# Altium PCB PCB_Cyborg greenC_Main.PcbDoc
Units mm, origin at the board's own origin, x right, y up, seen from the top; angles counter-clockwise.
Board outline 36.5 x 45.5 mm, 2 copper layers (Top Layer, Bottom Layer); 59 components, 74 nets, 243 pads, 102 vias.
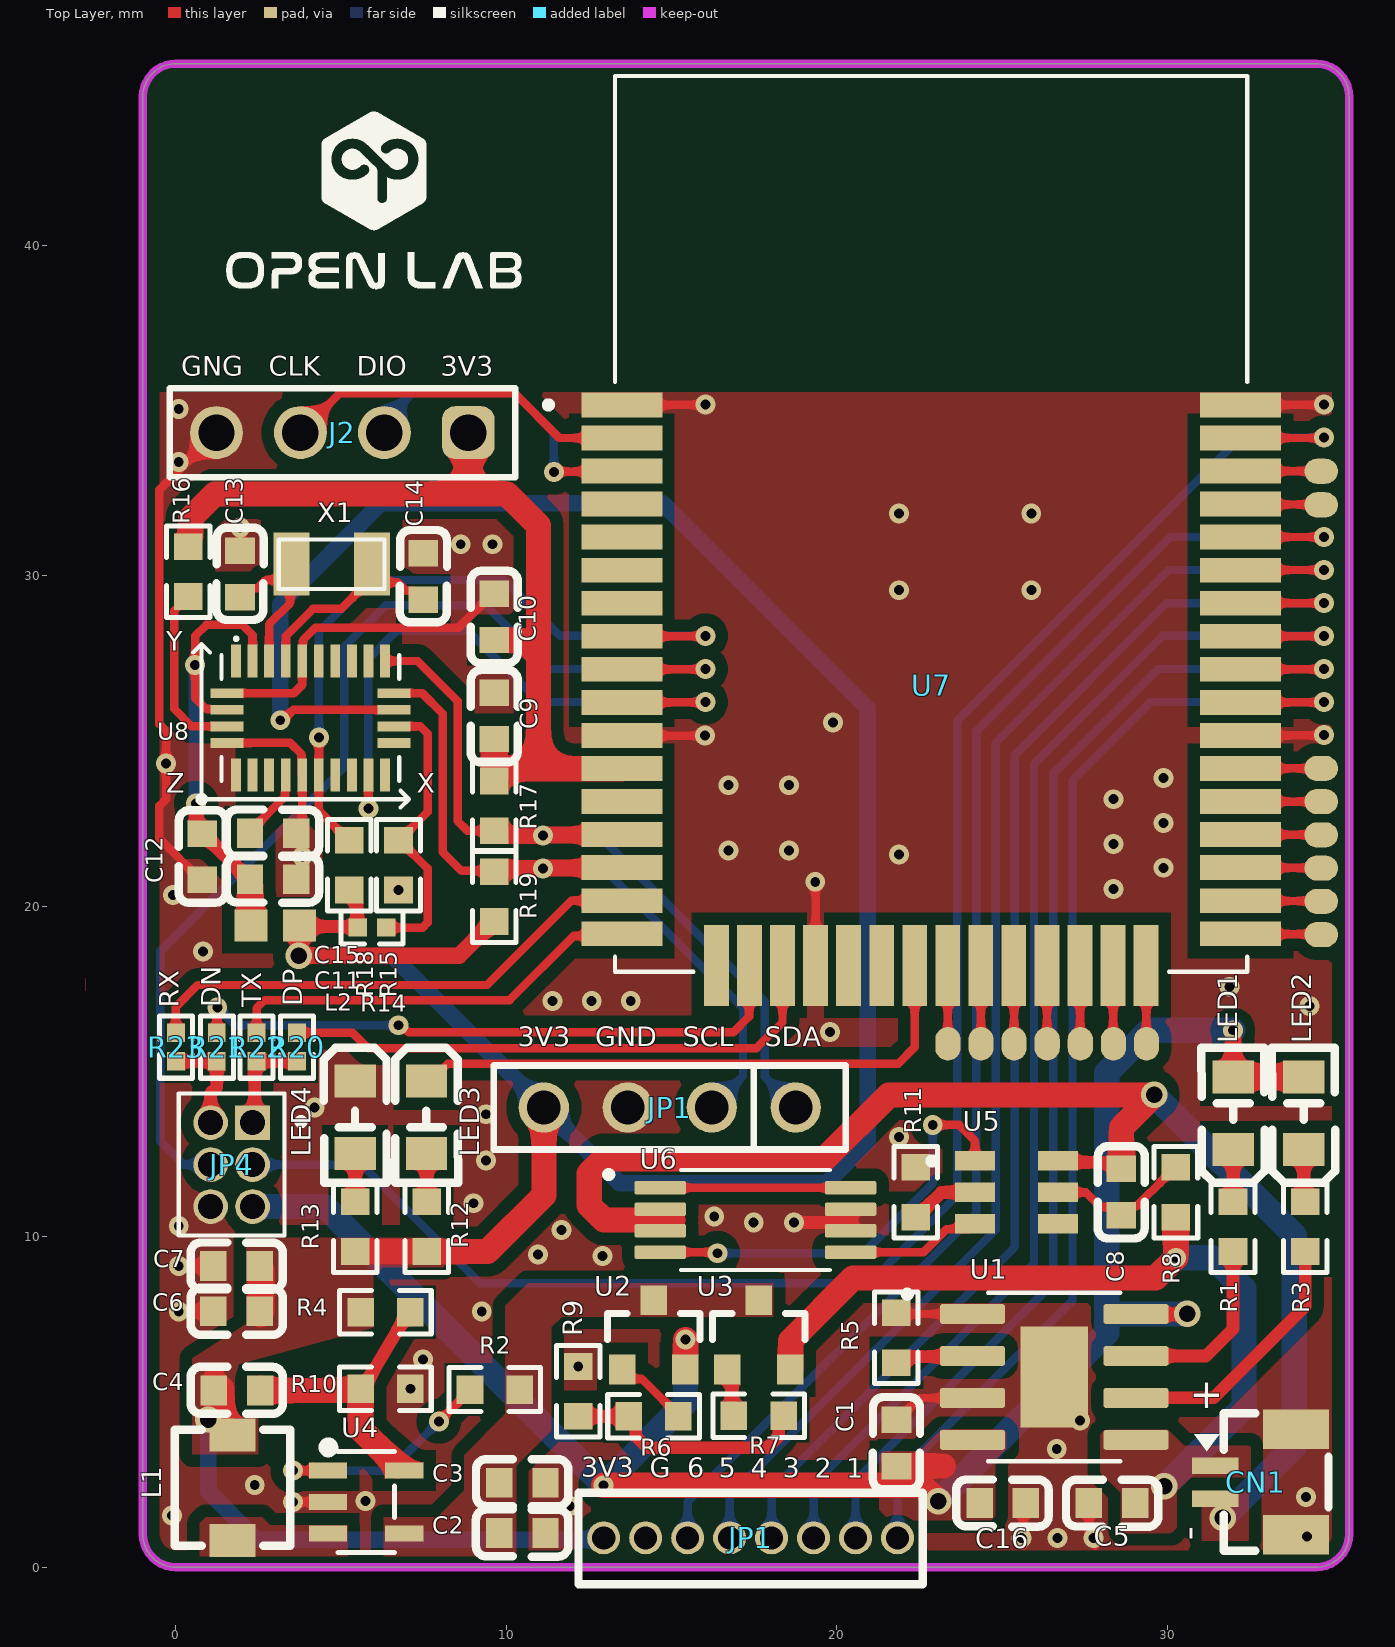
[diagram p0: Top Layer view]
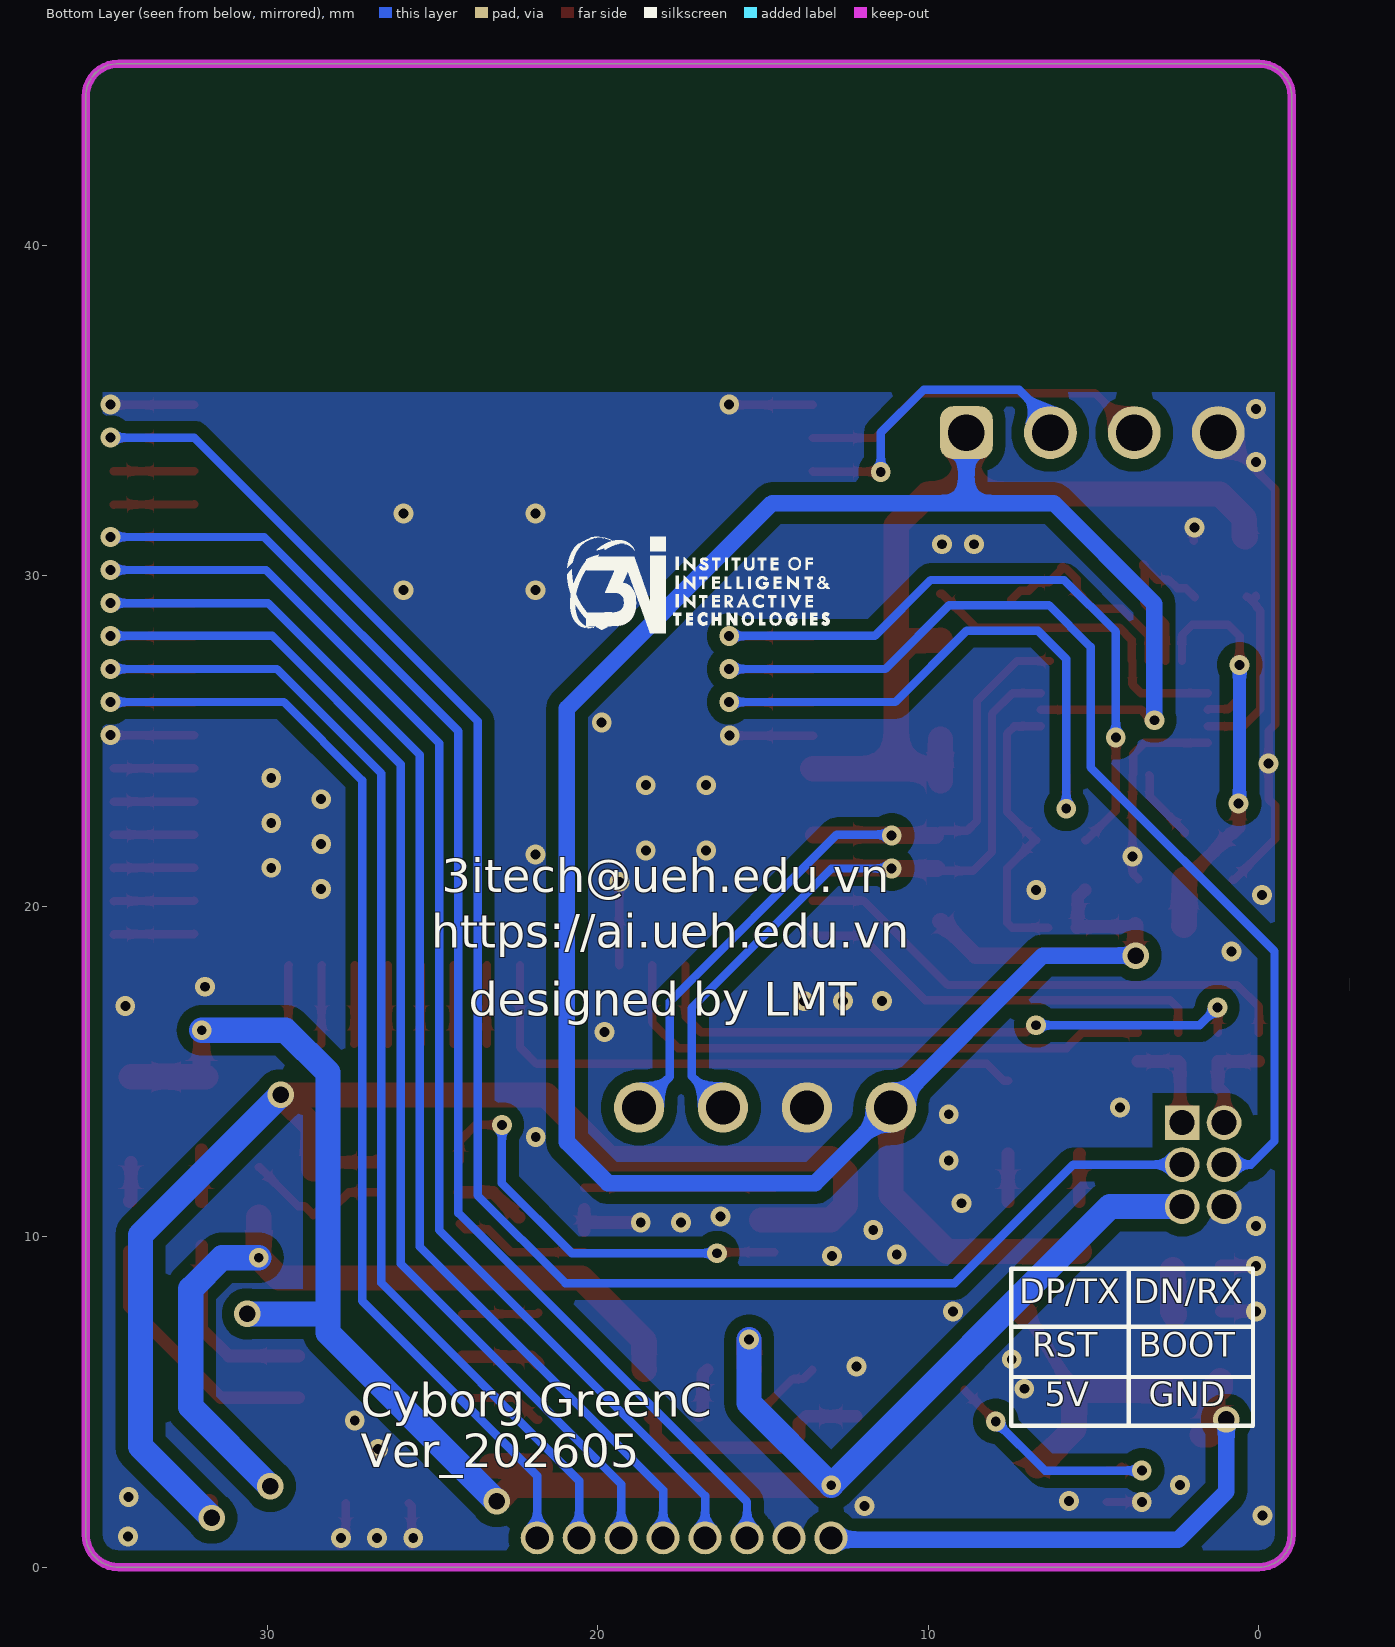
[diagram p1: Bottom Layer view, seen from below]

## Layer stack, top to bottom
Top Solder: solder mask 0.0102, Solder Resist, Dk 3.5
Top Layer: signal copper 0.0356
Dielectric 1: dielectric 0.32, FR-4, Dk 4.8
Bottom Layer: signal copper 0.0356
Bottom Solder: solder mask 0.0102, Solder Resist, Dk 3.5

## Board outline
-1,1 -1,44.5 cw(c0,44.5) 0,45.5 34.5,45.5 cw(c34.5,44.5) 35.5,44.5 35.5,1 cw(c34.5,1) 34.5,0 0,0 cw(c0,1)

## Design rules (kind name [scope] priority, off if disabled: settings)
Clearance Clear_GND [InNamedPolygon('GND_L01_P027') Or InNamedPolygon('GND_L02_P028')] p1: gap=0.381 ignorepadtopadclearanceinfootprint=FALSE
Clearance [All] p2: gap=0.2 ignorepadtopadclearanceinfootprint=FALSE
PolygonConnect [All] p1: connectstyle=Direct reliefconductorwidth=0.254 reliefentries=4 polygonreliefangle="90 Angle" airgapwidth=0.254
RoutingVias [All] p1: holewidth=0.3 width=0.6 viastyle="Through Hole" minholewidth=0.3 minwidth=0.6 maxholewidth=0.5 maxwidth=1.1
SolderMaskExpansion [IsVia] p1: expansion=0.102 istentingtop=TRUE
Width [All] p1: maxlimit=0.762 minlimit=0.254 preferedwidth=0.381
30 further rules are at their usual default settings.

## Components (designator, comment, footprint, x,y, rotation, side; value= is the part's Value field where it differs from the comment)
C1 "10uF" "CAP CERAMIC SMD 0603 TyPE 1608"#1 21.804,3.827 r90 top
C2 "22uF 16V" "CAP CERAMIC SMD 0603 TyPE 1608"#1 10.549,1.033 r0 top
C3 "100nF" "CAP CERAMIC SMD 0603 TyPE 1608"#1 10.549,2.557 r0 top
C4 "100pF/50V" "CAP CERAMIC SMD 0603 TyPE 1608"#1 1.913,5.351 r0 top
C5 "10uF" "CAP CERAMIC SMD 0603 TyPE 1608"#1 28.258,1.941 r180 top
C6 "22uF 16V" "CAP CERAMIC SMD 0603 TyPE 1608"#1 1.768,7.746 r180 top
C7 "22uF 16V" "CAP CERAMIC SMD 0603 TyPE 1608"#1 1.768,9.117 r180 top
C8 "100nF" "CAP CERAMIC SMD 0603 TyPE 1608"#1 28.608,11.418 r90 top
C9 "4.7uF" "CAP CERAMIC SMD 0603 TyPE 1608"#1 9.635,25.827 r90 top
C10 "100nF" "CAP CERAMIC SMD 0603 TyPE 1608"#1 9.635,28.824 r90 top
C11 "100nF" "CAP CERAMIC SMD 0603 TyPE 1608"#1 3.007,20.82 r0 top
C12 "1uF/16V" "CAP CERAMIC SMD 0603 TyPE 1608"#1 0.795,21.435 r270 top
C13 "22pF" "CAP CERAMIC SMD 0603 TyPE 1608"#1 1.938,29.989 r270 top
C14 "22pF" "CAP CERAMIC SMD 0603 TyPE 1608"#1 7.488,29.916 r270 top
C15 "100nF" "CAP CERAMIC SMD 0603 TyPE 1608"#1 3.007,22.213 r0 top
C16 "100nF" "CAP CERAMIC SMD 0603 TyPE 1608"#2 24.956,1.941 r0 top
CN1 "Hedader 2P SMD 1.0" CONN-SMD_2P-P1.00_BX-SH1.0-2PLT 32.876,2.578 r270 top
J2 "JP4-2.54" "CONNECTORS MALE HEADERS 1X4 2.54 TYPE STRAIGHT" 5.063,34.282 r180 top
JP1 "JP 1x8 1.27" HDR-TH_8P-P1.27-V-M 17.39,0.878 r0 top
JP1 "JP 1x4 1.27" "JP 1x4 CT" 18.753,13.911 r180 top
JP4 "JP 2x3 1.27 Cai Thang" "JP 2X3 CT 1.27" 1.684,12.184 r90 top
L1 "2.2uH(20%) 3A" IND-SMD_L3.5-W3.2 1.71,2.405 r90 top
L2 "10uH_0603" L_10uH_0603 3.005,19.423 r0 top
LED1 "LED0805" LED0805-YL 31.987,13.676 r90 top
LED2 "LED0805" LED0805-GR 34.12,13.676 r90 top
LED3 "LED0805" LED0805-BL 7.587,13.676 r270 top
LED4 "LED0805" LED0805-RD 5.428,13.676 r270 top
R1 "1K" "RES CHIPS SMD 0603 TYPE 1608" 31.987,10.3 r90 top
R2 "10K" "Res CHIPS SMD 0603 TYPE 1608" 9.66,5.377 r180 top
R3 "1K" "Res CHIPS SMD 0603 TYPE 1608" 34.171,10.3 r90 top
R4 "100K" "Res CHIPS SMD 0603 TYPE 1608" 6.333,7.714 r0 top
R5 "2.4K" "Res CHIPS SMD 0603 TYPE 1608" 21.801,6.952 r270 top
R6 "100K" "Res CHIPS SMD 0603 TYPE 1608" 14.461,4.567 r180 top
R7 "100K" "Res CHIPS SMD 0603 TYPE 1608" 17.627,4.587 r0 top
R8 "100R" "Res CHIPS SMD 0603 TYPE 1608" 30.259,11.355 r270 top
R9 "10K" "Res CHIPS SMD 0603 TYPE 1608" 12.175,5.329 r270 top
R10 "22K" "Res CHIPS SMD 0603 TYPE 1608" 6.333,5.402 r0 top
R11 "1K" "Res CHIPS SMD 0603 TYPE 1608" 22.385,11.355 r270 top
R12 "1K" "RES CHIPS SMD 0603 TYPE 1608" 7.587,10.317 r270 top
R13 "1K" "RES CHIPS SMD 0603 TYPE 1608" 5.428,10.317 r270 top
R14 "NC" R0402 5.933,19.356 r180 top
R15 "0R" "Res CHIPS SMD 0603 TYPE 1608" 6.735,21.239 r90 top
R16 "10K" "Res CHIPS SMD 0603 TYPE 1608" 0.372,30.134 r270 top
R17 "4.7K" "Res CHIPS SMD 0603 TYPE 1608" 9.635,23.03 r90 top
R18 "10K" "Res CHIPS SMD 0603 TYPE 1608" 5.247,21.256 r270 top
R19 "4.7K" "Res CHIPS SMD 0603 TYPE 1608" 9.635,20.304 r270 top
R20 "NC" R0402 3.662,15.741 r270 top
R21 "NC" R0402 1.237,15.741 r90 top
R22 "NC" R0402 2.442,15.741 r270 top
R23 "NC" R0402 -0.002,15.741 r90 top
U1 "TP4056" TP4056 26.576,5.758 r0 top
U2 "AO3401" AO3401 14.461,6.98 r0 top
U3 "AO3401" AO3401 17.636,6.98 r0 top
U4 "SY8089AAAC" SOT-23-5 5.774,2.049 r270 top
U5 "DW01" DW01A 25.433,11.346 r0 top
U6 "FS8205A" FS8205 17.534,10.508 r0 top
U7 "DWM3001C" DWM3001 22.855,31.571 r0 top locked
U8 "BNO085.1" BNO085 4.072,25.697 r0 top
X1 "32.768Khz 12.5pF" "CRYSTALS SMD FC-135 TYPE 2P" 4.605,30.396 r0 top

## Footprints (in the part's own frame and the unit in brackets; to place one, negate y for a bottom-side part, rotate by r counter-clockwise, add the part's x,y. Pads: shape width x height; smd on the part's side, far side on the other; paste and mask are expansions set on the pad)
AO3401 [mm]
  rect 0.8x0.9 smd: 1(-0.95,-1) 2(0.95,-1) 3(0,1.1)
  silkscreen extent -1.4,-0.1 1.4,0.7, body extent -1.45,-1.27 1.45,1.53, height 1.25
BNO085 [mm]
  rect 0.3x1 smd: 1(-2.25,1.725) 6(-2.25,-1.725) 7(-1.75,-1.725) 8(-1.25,-1.725) 9(-0.75,-1.725) 10(-0.25,-1.725) 11(0.25,-1.725) 12(0.75,-1.725) 13(1.25,-1.725) 14(1.75,-1.725) 15(2.25,-1.725) 20(2.25,1.725) 21(1.75,1.725) 22(1.25,1.725) 23(0.75,1.725) 24(0.25,1.725) 25(-0.25,1.725) 26(-0.75,1.725) 27(-1.25,1.725) 28(-1.75,1.725)
  rect 1x0.3 smd: 2(-2.525,0.75) 3(-2.525,0.25) 4(-2.525,-0.25) 5(-2.525,-0.75) 16(2.525,-0.75) 17(2.525,-0.25) 18(2.525,0.25) 19(2.525,0.75)
  silkscreen extent -2.69,-1.9 2.69,2.45, body extent -2.6,-1.9 2.6,1.9, height 1.18
"CAP CERAMIC SMD 0603 TyPE 1608"#1 [mm]
  rect 0.8x0.9 smd: 1(-0.765,0) 2(0.635,0)
  silkscreen extent -1.47,-0.71 1.33,0.72, body extent -0.93,-0.4 0.67,0.4, height 0.8
"CAP CERAMIC SMD 0603 TyPE 1608"#2 [mm]
  rect 0.8x0.9 smd: 1(-0.638,0) 2(0.762,0)
  silkscreen extent -1.34,-0.71 1.45,0.72, body extent -0.8,-0.4 0.8,0.4, height 0.8
CONN-SMD_2P-P1.00_BX-SH1.0-2PLT [mm]
  rect 0.5x1.4 smd paste+0 mask+0.05: 1(-0.5,-1.428) 2(0.5,-1.428)
  rect 1.2x2 smd paste+0 mask+0.05: 3(1.6,1.022) 4(-1.6,1.022)
  silkscreen extent -2.08,-2.06 2.08,2, body extent -2.07,-1.79 2.17,2.06, height 5.56
"CONNECTORS MALE HEADERS 1X4 2.54 TYPE STRAIGHT" [mm]
  rrect50% 1.6x1.6 hole 1.1: 1(-3.785,-0.051)
  round 1.6 hole 1.1: 2(-1.245,-0.051) 3(1.295,-0.051) 4(3.835,-0.051)
  silkscreen extent -5.2,-1.4 5.26,1.29, body extent -5.05,-1.32 5.11,1.22, height 8.57
"CRYSTALS SMD FC-135 TYPE 2P" [mil]
  rect 43x75 smd: 1(-43.86,-1.75) 2(52.14,-1.75)
  silkscreen extent -59,-31 67,28, body extent -59,-32 67,27, height 31
DW01A [mm]
  rect 1.21x0.59 smd: 1(-1.255,0.95) 2(-1.255,0) 3(-1.255,-0.95) 4(1.255,-0.95) 5(1.255,0) 6(1.255,0.95)
  silkscreen extent -2.65,0.85 -2.46,1.05, body extent -1.4,-1.45 1.4,1.45, height 1.45
DWM3001 [mm]
  rect 2.45x0.75 smd: 1(-9.36,3.6) 2(-9.36,2.6) 3(-9.36,1.6) 4(-9.36,0.6) 5(-9.36,-0.4) 6(-9.36,-1.4) 7(-9.36,-2.4) 8(-9.36,-3.4) 9(-9.36,-4.4) 10(-9.36,-5.4) 11(-9.36,-6.4) 12(-9.36,-7.4) 13(-9.36,-8.4) 14(-9.36,-9.4) 15(-9.36,-10.4) 16(-9.36,-11.4) 17(-9.36,-12.4) 32(9.36,-12.4) 33(9.36,-11.4) 34(9.36,-10.4) 35(9.36,-9.4) 36(9.36,-8.4) 37(9.36,-7.4) 38(9.36,-6.4) 39(9.36,-5.4) 40(9.36,-4.4) 41(9.36,-3.4) 42(9.36,-2.4) 43(9.36,-1.4) 44(9.36,-0.4) 45(9.36,0.6) 46(9.36,1.6) 47(9.36,2.6) 48(9.36,3.6)
  rect 0.75x2.45 smd: 18(-6.5,-13.36) 19(-5.5,-13.36) 20(-4.5,-13.36) 21(-3.5,-13.36) 22(-2.5,-13.36) 23(-1.5,-13.36) 24(-0.5,-13.36) 25(0.5,-13.36) 26(1.5,-13.36) 27(2.5,-13.36) 28(3.5,-13.36) 29(4.5,-13.36) 30(5.5,-13.36) 31(6.5,-13.36)
  silkscreen extent -11.68,-13.55 9.56,13.55, body extent -9.44,-13.46 9.69,13.64, height 3.2
FS8205 [mm]
  rrect25% 1.56x0.4 smd: 1(-2.88,0.975) 2(-2.88,0.325) 3(-2.88,-0.325) 4(-2.88,-0.975) 5(2.88,-0.975) 6(2.88,-0.325) 7(2.88,0.325) 8(2.88,0.975)
  silkscreen extent -4.54,-1.52 2.25,1.52, body extent -3.2,-1.47 3.2,1.47, height 1.2
HDR-TH_8P-P1.27-V-M [mm]
  round 1 hole 0.7 paste-2539.97 mask+0.051: 1(-4.445,0.011) 2(-3.175,0.011) 3(-1.905,0.011) 4(-0.635,0.011) 5(0.635,0.011) 6(1.905,0.011) 7(3.175,0.011) 8(4.445,0.011)
  silkscreen extent -5.21,-1.4 5.21,1.37, body extent -5.08,-1.25 5.08,1.25, height 4.61
IND-SMD_L3.5-W3.2 [mm]
  rect 1x1.4 smd paste+0 mask+0.051: 1(-1.6,0) 2(1.6,0)
  silkscreen extent -1.75,-1.75 1.75,1.75, body extent -1.85,-1.7 1.85,1.7, height 1.19
"JP 1x4 CT" [mm]
  round 1.52 hole 1.02: 1(0,0) 2(2.54,0) 3(5.08,0) 4(7.62,0)
  silkscreen extent -1.52,-1.27 9.14,1.27, body extent -1.52,-1.25 9.14,1.25, height 8.51
"JP 2X3 CT 1.27" [mm]
  rect 1.05x1.05 / inner round 1.05 / far side rect 1.05x1.05 hole 0.75: 1(1.27,-0.635)
  round 1.05 hole 0.75: 2(1.27,0.635) 3(0,-0.635) 4(0,0.635) 5(-1.27,-0.635) 6(-1.27,0.635)
  silkscreen extent -2.15,-2.2 2.15,1.6
L_10uH_0603 [mm]
  rect 1x0.97 smd: 1(-0.735,0) 2(0.735,0)
  body extent -0.8,-0.4 0.8,0.4, height 0.95
LED0805-BL [mm]
  rect 1x1.25 smd paste+0 mask+0.051: 1(-1.04,-0.005) 2(1.16,-0.005)
  silkscreen extent -2.04,-0.96 2.04,0.96, body extent -1.01,-0.66 0.99,0.59, height 0.8
LED0805-GR [mm]
  rect 1x1.25 smd paste+0 mask+0.051: 1(-1.04,-0.005) 2(1.16,-0.005)
  silkscreen extent -2.04,-0.96 2.04,0.96, body extent -1,-0.63 1,0.63, height 1.2
LED0805-RD [mm]
  rect 1x1.25 smd paste+0 mask+0.051: 1(-1.04,-0.005) 2(1.16,-0.005)
  silkscreen extent -2.04,-0.96 2.04,0.96, body extent -0.92,-0.65 1.08,0.6, height 1.13
LED0805-YL [mm]
  rect 1x1.25 smd paste+0 mask+0.051: 1(-1.04,-0.005) 2(1.16,-0.005)
  silkscreen extent -2.04,-0.96 2.04,0.96, body extent -0.95,-0.66 1.05,0.59, height 0.8
R0402 [mm]
  rect 0.566x0.54 smd paste-100 mask+0.051: 1(-0.433,0) 2(0.433,0)
  silkscreen extent -0.94,-0.5 0.94,0.5
"RES CHIPS SMD 0603 TYPE 1608" [mil]
  rect 31.75x34.02 smd: 1(-29.31,0) 2(30,0)
  silkscreen extent -54,-26 55,26, body extent -31,-16 32,16, height 17
"Res CHIPS SMD 0603 TYPE 1608" [mil]
  rect 31.75x34.02 smd: 1(-29.31,0) 2(30,0)
  silkscreen extent -54,-26 55,26, body extent -31,-16 32,16, height 17
SOT-23-5 [mm]
  rect 0.49x1.157 smd paste+0 mask+0.051: 1(-0.876,-1.171) 2(0.074,-1.171) 3(1.024,-1.171)
  rect 0.49x1.175 smd paste+0 mask+0.051: 4(1.024,1.137) 5(-0.876,1.137)
  silkscreen extent -1.73,-1.31 1.6,0.83, body extent -1.42,-1.2 1.58,1.3, height 1.1
TP4056 [mm]
  rrect25% 1.97x0.6 smd: 1(-2.475,1.905) 2(-2.475,0.635) 3(-2.475,-0.635) 4(-2.475,-1.905) 5(2.475,-1.905) 6(2.475,-0.635) 7(2.475,0.635) 8(2.475,1.905)
  rect 2.032x3.048 smd paste-3: 9(0,0)
  silkscreen extent -4.54,-2.55 2,2.6, body extent -3,-2.45 3,2.45, height 1.75

## Part data
C1 C5 C8 C16: library part "CAP 10uF", "10V 10uF X5R ±10% 0603 Multilayer Ceramic Capacitors MLCC - SMD/SMT ROHS", JLCPCB Part Class="Extended Part", Manufacturer="Samsung Electro-Mechanics", Manufacturer Part=CL10A106KP8NNNC, Add into BOM=yes, Convert to PCB=yes, Device=GMI4013S-2C42DB, Origin Footprint=MIC-SMD_BD4.0_B4013AM423-008, Supplier=LCSC, Supplier Part=C19702, Symbol=GMI4013S-2C42DB
C2 C3 C4 C6 C7 C9 C10 C11 C12 C13 C14 C15: library part "CAP 0603 50V 10%", "0603 Multilayer Ceramic Capacitors MLCC - SMD/SMT ROHS"
J2: library part "CONNECTORS MALE HEADERS 1X4 2.54", "WR-PHD Pin Header, THT, pitch 2.54mm, Single Row, Angled, 4p", Contact Resistance=20mOhm, Manufacturer="Wurth Elektronik", Manufacturer Part Number=61300411021, Operating Temperature="-40 to +105degC", Rated Current=3A, Withstanding Voltage=500VAC, Working Voltage=250VAC, ComponentLink1Description=Manufacturer, ComponentLink1URL=http://www.we-online.de, ComponentLink2Description=Datasheet, ComponentLink2URL=https://www.we-online.com/catalog/datasheet/61300411021.pdf, Gender="Pin Header", Mounting Technology=THT, Orientation=Angled, Packaging=Bag, Pin Number=4, Pitch=2.54mm, Row Number=Single
JP1: library part "JP 1x8 2.54 Duc Thang", "Cắm", Chung_Loai=Cắm, Don_Vi=Con, Ma_Hang=MH000903, Ten_Linh_Kien="Jump Đơn Đực 2.54MM 1x40P Thẳng 11MM"
JP1: library part "JP 1x4 2.54 Cai Thang", "Cắm", Chung_Loai=Cắm, Don_Vi=Con, Ma_Hang=MH004006, Ten_Linh_Kien="Jump Đơn Cái 2.54MM 1x20P Thẳng"
L1: library part "CUON CAM SMD"
L2: library part L_10uH_0603, "Inductor with Inductance 10uH Tol.+/-20% Package 0603 (1608)", Package="0603 Murata", Check_prices=https://www.snapeda.com/parts/LQM18DN100M70L/Murata/view-part/?ref=eda, MF="Murata Electronics", MP=LQM18DN100M70L, SnapEDA_Link=https://www.snapeda.com/parts/LQM18DN100M70L/Murata/view-part/?ref=snap
R1 R8 R12 R13: library part "RES 1K", "62.5mW Thick Film Resistors 50V ±100ppm/℃ ±1% 1kΩ 0402 Chip Resistor - Surface Mount ROHS", JLCPCB Part Class="Extended Part", Manufacturer="UNI-ROYAL(Uniroyal Elec)", Manufacturer Part=0402WGF1001TCE, Add into BOM=yes, Convert to PCB=yes, Device=GMI4013S-2C42DB, Origin Footprint=MIC-SMD_BD4.0_B4013AM423-008, Supplier=LCSC, Supplier Part=C11702, Symbol=GMI4013S-2C42DB
R2 R4 R6 R7 R9 R10 R15 R16 R17 R18 R19: library part "RES 0603 1%_", "±1% - Chip Resistor - Surface Mount ROHS", Chung_Loai=Dán, Don_Vi=Con, Ma_Hang=MH005880, So_Chan=2
R3 R11: library part "RES 10K", "62.5mW Thick Film Resistors 50V ±100ppm/℃ ±1% 10kΩ 0402 Chip Resistor - Surface Mount ROHS", JLCPCB Part Class="Extended Part", Manufacturer="UNI-ROYAL(Uniroyal Elec)", Manufacturer Part=0402WGF1002TCE, Add into BOM=yes, Convert to PCB=yes, Device=GMI4013S-2C42DB, Origin Footprint=MIC-SMD_BD4.0_B4013AM423-008, Supplier=LCSC, Supplier Part=C25744, Symbol=GMI4013S-2C42DB
R5: library part "RES 1.2K", "62.5mW Thick Film Resistors 50V ±100ppm/℃ ±1% 1.2kΩ 0402 Chip Resistor - Surface Mount ROHS", JLCPCB Part Class="Extended Part", Manufacturer=YAGEO, Manufacturer Part=RC0402FR-071K2L, Add into BOM=yes, Convert to PCB=yes, Device=GMI4013S-2C42DB, Origin Footprint=MIC-SMD_BD4.0_B4013AM423-008, Supplier=LCSC, Supplier Part=C138040, Symbol=GMI4013S-2C42DB
R14 R20 R21 R22 R23: library part "RES 0402", "RES SMD 0402", Manufacturer="Vishay Dale", Manufacturer Part Number=CRCW040210K0FKED, Operating Temperature="-55°C ~ 155°C", Package / Case="0402 (1005 Metric)", Power (Watts)="0.063W, 1/16W", Resistance (Ohms)=10k, Supplier Part Number 1=541-10.0KLCT-ND, Temperature Coefficient=±100ppm/°C, Tolerance=±1%, Category=Resistors, ComponentLink1Description=http://www.vishay.com/docs/20035/dcrcwe3.pdf, ComponentLink1URL=http://www.vishay.com/docs/20035/dcrcwe3.pdf, Composition="Thick Film", Features="Automotive AEC-Q200", Height="0.016\" (0.40mm)", Number of Terminations=2, Packaging="Cut Tape (CT)", Pricing 1="10=0.083, 50=0.0444, 200=0.0255, 1000=0.0174 (USD)", RoHS="RoHS Compliant", Size / Dimension="0.039\" L x 0.020\" W (1.00mm x 0.50mm)", Stock 1=2392462, Supplier 1=Digi-Key, Supplier Device Package="0402 (1005 Metric)"
U1: "ESOP-8 Battery Management ROHS", JLCPCB Part Class="Extended Part", Manufacturer="TOPPOWER(Nanjing Extension Microelectronics)", Manufacturer Part=TP4056-42-ESOP8, Add into BOM=yes, Convert to PCB=yes, Device=GMI4013S-2C42DB, Origin Footprint=MIC-SMD_BD4.0_B4013AM423-008, Supplier=LCSC, Supplier Part=C16581, Symbol=GMI4013S-2C42DB
U2 U3: "P-Channel 30 V 4A (Ta) 1.4W (Ta) Surface Mount SOT-23-3", Package="SOT-23-3 Alpha &amp; Omega Semiconductor", Check_prices=https://www.snapeda.com/parts/AO3401/Alpha/view-part/?ref=eda, MF="Alpha & Omega Semiconductor", MP=AO3401, SnapEDA_Link=https://www.snapeda.com/parts/AO3401/Alpha/view-part/?ref=snap
U4: library part "POWER CONVERTERS SY8089AAAC", Input Voltage=-, JLCPCB Part Class="Extended Part", Manufacturer=silergy(矽力杰), Add into BOM=yes, Convert to PCB=yes, Datasheet=https://atta.szlcsc.com/upload/public/pdf/source/20210826/394049C81A2AF57A190C26FDBC282657.pdf, Device=SY8089AAAC, Function="Step-down type", LCSC Part Name=SY8089AAAC, Manufacturer Part=SY8089AAAC, Number of Outputs=-, Output Current (Max)=-, Supplier=LCSC, Supplier Footprint=SOT-23-5, Supplier Part=C78988, Switch tube (built-in/external)=内置, Switching Frequency=-, Symbol=SY8089AAAC, Synchronous Rectification=-, Topology=-
U6: library part FS8205
U7: "RF Modules 6.5 & 8.0 GHz Ultra-Wideband (UWB) Module with BLE SoC and Motion Sensor", Package=None, Check_prices=https://www.snapeda.com/parts/DWM3001C/Qorvo/view-part/?ref=eda, MF=Qorvo, MP=DWM3001C, SnapEDA_Link=https://www.snapeda.com/parts/DWM3001C/Qorvo/view-part/?ref=snap
X1: library part "CRYSTALS 2P", "Crystals ROHS", BOM_JLCPCB Part Class="Extended Part", BOM_Manufacturer=TAITIEN(泰艺电子), BOM_Manufacturer Part=XIHCELNANF-12MHZ, BOM_Supplier=LCSC, BOM_Supplier Part=C295072, Contributor=LCSC, nameAlias=Frequency, spicePre=X, spiceSymbolName=XIHCELNANF-12MHZ

## Free pads (board coordinates)
  oval 0.762x1.016 smd: 2(23.358,15.842) 2(24.36,15.842) 2(25.362,15.842) 2(26.364,15.842) 2(27.366,15.842) 2(28.368,15.842) 2(29.37,15.842)
  oval 1.016x0.762 smd: 2(34.654,19.144) 2(34.654,20.149) 2(34.654,21.155) 2(34.654,22.161) 2(34.654,23.167) 2(34.654,24.173) 2(34.654,32.148) 2(34.654,33.164)

## Via types
v1: diameter 0.6, hole 0.3, Top Layer to Bottom Layer, tented both sides, 95 vias
v2: diameter 0.8, hole 0.5, Top Layer to Bottom Layer, tented both sides, 7 vias

## Nets (pads, with @x,y where several pads share a name; then routed paths per layer and width w, separated by ;. In a path a pad name is that pad's centre, name@x,y a point inside that pad or via, vN(x,y) a via of type N, cw(c..) or ccw(c..) an arc to the next point about the centre after c; other vN are vias at no path point)
5V_DEBUG: C1.1 C16.1 JP4.5 LED1.2 LED2.2 U1.4 U1.8 U2.2 | length 59.5
  Top Layer w0.381: U1.8@29.016,7.654 v2@30.594,7.654
  Top Layer w0.508: v1(31.987,16.248) 31.992,16.243 31.992,14.844 LED1.2
  Top Layer w0.762: v1(12.937,2.481) 22.566,2.481 23.055,1.993 v2(23.065,1.993) ; U2.2 15.411,6.037 15.423,6.049 v1(15.423,6.89) ; C1.1@21.735,2.994 21.735,3.044 21.754,3.063 23.231,3.063 ; LED1.2@31.867,14.836 LED1.2 ; LED1.2@31.992,14.844 34.117,14.844 LED2.2
  Bottom Layer w0.762: JP4.5 4.504,10.914 v1(12.937,2.481) 15.423,4.968 v1(15.423,6.89) ; v2(23.065,1.993) 28.168,7.096 28.168,7.595 ; v2(30.606,7.666) 28.239,7.666 28.168,7.595 ; v1(31.987,16.248) 29.447,16.248 28.168,14.969 28.168,7.595
BAT+: C5.1 CN1.1 R8.2 U1.5 U3.2 | length 24.2
  Top Layer w0.762: U3.2 18.605,5.999 18.605,6.865 20.491,8.752 29.646,8.752 v1(30.259,9.365) R8.2
  Bottom Layer w0.762: v2(29.913,2.447) 32.317,4.851 32.317,8.425 31.377,9.365 v1(30.259,9.365)
BNO_INT: U7.10 U8.14 | length 19.5
  Top Layer w0.254: U8.14 5.823,23.971 5.823,22.955 v1(5.825,22.954) ; U7.10 v1@16.015,26.171
  Bottom Layer w0.254: v1(5.825,22.954) 5.825,27.484 6.679,28.338 8.839,28.338 10.996,26.181 v1(16.025,26.181)
BNO_RST: R18.1 U7.8 U8.11 | length 22.3
  Top Layer w0.254: v1(4.326,25.113) 4.324,25.111 4.324,23.974 U8.11 4.322,22.897 5.218,22.001 R18.1 ; U7.8 v1@16.015,28.171
  Bottom Layer w0.254: v1(4.326,25.113) 4.326,28.309 5.89,29.874 9.928,29.874 11.621,28.181 v1(16.025,28.181)
BOOT: JP4.4 U7.9 | length 33.9
  Top Layer w0.254: U7.9 v1@16.015,27.171
  Bottom Layer w0.254: JP4.4 0.237,12.184 -0.475,12.895 -0.475,18.639 5.089,24.203 5.089,27.851 6.354,29.115 9.366,29.115 11.3,27.181 v1(16.025,27.181)
GND: C1.2 C2.2 C3.2 C5.2 C6.2 C7.2 C9.2 C10.2 C11.2 C12.2 C13.1 C14.1 C15.2 C16.2 CN1.3 CN1.4 J2.4 JP1.2@14.215,0.889 JP1.3@13.673,13.911 JP4.6 LED4.1 R5.1 R9.1 R10.2 R11.1 R15.1 U1.1 U1.3 U1.9 U4.2 U6.6 U6.7 U7.1 U7.11 U7.21 U7.38 U7.48 U8.2 U8.5 U8.6 U8.10 U8.25 | length 57.4
  Top Layer w0.254: C12.2 0.745,20.8 -0.5,22.045 -0.5,23.037 -0.297,23.24 -0.297,25.309 -0.5,25.512 -0.5,32.606 J2.4 ; U8.5 3.459,24.947 3.799,24.607 3.799,23.995 U8.10 3.822,21 C11.2 ; U8.2 3.565,26.447 3.822,26.704 U8.25 3.845,27.445 3.845,28.057 4.22,28.432 8.558,28.432 9.585,29.459 C10.2 ; v1(1.944,31.46) 1.964,31.44 C13.1@1.964,31.059 ; v1(3.539,1.973) 3.541,1.975 U4.2 ; U7.11@13.48,25.161 v1@16,25.161 ; U7.1 v1@16.015,35.171 ; U7.21 v1@19.355,20.731 ; R5.1 21.834,7.663 U1.1 ; C1.2 21.854,4.462 22.514,5.123 U1.3 ; v1@25.637,0.652 25.637,1.859 C16.2 ; C5.2 27.623,0.944 27.821,0.746 v1@27.821,0.652 ; U7.38 v1@34.735,25.171 ; U7.48 v1@34.735,35.171
  Top Layer w0.381: v1(0.084,9.111) 0.091,9.117 C7.2 ; v1@0.091,7.746 C6.2 ; v1(18.702,10.431) 20.338,10.431 ; U6.6 U6.7
  other v1: 25.586,0.881 26.678,0.881 27.77,0.881 34.221,0.932 -0.117,1.566 11.929,1.854 5.738,2.004 34.196,2.126 2.385,2.487 26.653,3.573 27.356,4.445 7.095,5.402 12.175,6.073 7.476,6.291 0.084,7.739 9.254,7.739 12.911,9.415 10.955,9.466 11.667,10.203 0.084,10.33 17.483,10.431 16.289,10.609 9,11.016 9.381,12.311 21.877,13.022 9.381,13.708 4.199,13.911 19.795,16.197 34.298,16.985 11.398,17.137 12.581,17.137 13.764,17.137 31.883,17.566 0.821,18.636 -0.094,20.337 6.735,20.494 28.372,20.523 19.345,20.741 29.883,21.164 3.824,21.505 21.883,21.566 16.721,21.684 18.548,21.684 28.372,21.882 29.883,22.523 28.372,23.241 16.721,23.665 18.548,23.665 29.883,23.882 -0.297,24.325 16.01,25.171 34.745,25.181 19.883,25.566 21.883,29.566 25.883,29.566 8.619,30.955 9.584,30.955 21.883,31.882 25.883,31.882 0.084,33.444 0.084,35.044 16.025,35.181 34.745,35.181
GND_Pin: C8.2 CN1.2 U5.6 U6.2 U6.3 | length 42.5
  Top Layer w0.381: U5.6 26.731,12.253 28.416,12.253 C8.2@28.612,12.057 ; v2(31.682,1.491) 31.682,1.972 31.741,2.032 CN1.2@31.771,2.032
  Top Layer w0.762: 15.045,10.508 12.951,10.508 12.505,10.954 12.505,11.915 12.951,12.362 19.642,12.362 21.573,14.292 v2(29.599,14.292) 28.608,13.302 C8.2
  Bottom Layer w0.762: v2(29.599,14.292) 33.841,10.05 33.841,3.65 v2(31.682,1.491)
LED1: LED3.1 U7.24 | length 17.7
  Top Layer w0.254: LED3.1 7.707,14.716 8.223,15.232 21.852,15.232 22.355,15.735 U7.24
NetC4_2: C4.2 R4.2 R10.1 U4.5 | length 8.7
  Top Layer w0.381: R10.1 5.801,5.644 6.882,7.472 R4.2@7.072,7.663
  Top Layer w0.762: C4.2@2.567,5.42 2.548,5.401 C4.2 5.566,5.351 R10.1@5.588,5.374 ; R10.1 R10.1@5.588,5.374 ; U4.5@6.704,3.062 5.588,4.177 R10.1@5.588,5.374 ; R4.2@7.072,7.663 R4.2@7.095,7.685
NetC8_1: C8.1 R8.1 U5.5 | length 4.5
  Top Layer w0.254: U5.5 27.538,11.346 27.979,10.905 28.357,10.905 C8.1 28.881,10.927 29.069,10.927 29.954,11.812 29.954,11.823 30.231,12.099 R8.1
NetC11_1: C11.1 C12.1 L2.1 U8.3 U8.28 | length 13.9
  Top Layer w0.254: v1(0.581,27.305) 0.581,26.3 0.912,25.97 1.524,25.97 U8.3 ; v1@0.581,27.343 0.581,28.178 0.919,28.516 2.015,28.516 2.322,28.209 U8.28
  Top Layer w0.4: v1@0.601,23.106 0.603,23.105 0.603,22.393 C12.1 ; C12.1@0.845,22.2 1.045,22 1.045,21.972 C11.1@1.948,21.07
  Top Layer w0.762: C11.1 2.256,20.806 2.256,19.437 L2.1
  Bottom Layer w0.4: v1(0.581,27.305) 0.581,23.143 v1(0.61,23.114)
NetC13_2: C13.2 U8.27 X1.1 | length 5.2
  Top Layer w0.254: C13.2 2.211,29.627 2.465,29.627 2.713,29.875 3.072,29.875 3.173,29.976 3.491,30.294 X1.1 3.452,30.312 3.452,29.167 2.822,28.536 U8.27
NetC14_2: C14.2 U8.26 X1.2 | length 7
  Top Layer w0.254: U8.26 3.325,27.425 3.325,28.179 4.145,28.999 5.001,28.999 5.511,29.508 5.511,29.901 X1.2@5.83,30.221 ; X1.2@5.974,30.239 5.935,30.278 X1.2@5.935,30.221 ; C14.2 7.215,29.554 6.961,29.554 6.713,29.802 X1.2@6.354,29.802 ; X1.2@5.935,30.221 X1.2@6.253,29.903 ; X1.2@5.935,30.221 X1.2@6.253,29.903 ; X1.2@6.253,29.903 X1.2@6.354,29.802 ; X1.2@6.253,29.903 X1.2@6.354,29.802
NetC15_1: C15.1 U8.9 | length 2.2
  Top Layer w0.254: C15.1 2.242,22.263 3.299,23.32 3.299,23.949 U8.9
NetJP4_1: JP4.1 R20.2 R22.2 | length 3.1
  Top Layer w0.381: JP4.1 2.381,13.515 2.381,15.247 R22.2 R20.2
NetJP4_2: JP4.2 R21.1 R23.1 | length 3.2
  Top Layer w0.381: R23.1 R21.1 1.237,14.53 1.049,14.343 JP4.2
NetL1_1: L1.1 U4.3
NetLED1_1: LED1.1 R1.2 | length 1.6
  Top Layer w0.381: R1.2 R1.2@31.987,11.067 ; R1.2@31.992,11.067 LED1.1
NetLED2_1: LED2.1 R3.2 | length 1.3
  Top Layer w0.381: LED2.1@34.125,12.255 34.125,11.108 R3.2 R3.2@34.171,11.108
NetLED3_2: LED3.2 R12.1 | length 1.5
  Top Layer w0.381: LED3.2 7.587,12.511 R12.1
NetLED4_2: LED4.2 R13.1 | length 1.5
  Top Layer w0.381: LED4.2 5.428,12.511 R13.1
NetR1_1: R1.1 U1.7 | length 5.8
  Top Layer w0.381: U1.7 31.166,6.393 31.987,7.214 R1.1@31.987,9.724
NetR2_2: R2.2 U4.1 | length 7.6
  Top Layer w0.254: v1@3.541,2.925 U4.1@4.27,2.925 ; U4.1@4.152,3.043 U4.1@4.27,2.925 ; U4.1 U4.1@4.27,2.925 ; v1(7.958,4.412) 7.962,4.412 8.898,5.348 R2.2
  Bottom Layer w0.254: v1(3.539,2.923) 6.47,2.923 v1(7.958,4.412)
NetR3_1: R3.1 U1.6 | length 7.9
  Top Layer w0.381: U1.6 31.402,5.123 34.171,7.891 R3.1
NetR5_2: R5.2 U1.2 | length 2.4
  Top Layer w0.381: R5.2@21.801,6.158 22.017,6.373 U1.2@24.082,6.373
NetR6_1: R6.1 U2.1 | length 2.3
  Top Layer w0.254: U2.1 13.511,5.968 13.784,5.695 14.106,5.695 15.205,4.596 R6.1
NetR6_2: R6.2 R7.2 R9.2 | length 7.5
  Top Layer w0.381: R9.2 R6.2 13.911,4.354 13.911,3.976 14.271,3.616 17.889,3.616 18.242,3.969 18.242,4.374 R7.2@18.422,4.554
NetR7_1: R7.1 U3.1 | length 1.5
  Top Layer w0.381: U3.1 16.826,5.84 16.826,4.71 R7.1@16.948,4.587
NetR11_2: R11.2 U5.2 | length 2.1
  Top Layer w0.381: R11.2 22.414,10.593 23.167,11.346 U5.2
NetR14_1: R14.1 R15.2 U8.17 | length 8.9
  Top Layer w0.254: R14.1 7.468,19.356 7.617,19.504 7.617,21.147 R15.2@6.764,22.001 ; U8.17 7.395,25.447 7.617,25.225 7.617,22.854 R15.2@6.764,22.001 ; R15.2 R15.2@6.764,22.001
NetR16_2: R16.2 U8.4 | length 5.5
  Top Layer w0.254: R16.2@0.092,29.344 R16.2@0.092,29.401 ; R16.2 0.343,29.372 0.067,29.096 0.067,29.06 -0.046,28.947 -0.046,25.97 0.477,25.447 U8.4
NetU5_1: U5.1 U6.4 | length 13
  Top Layer w0.254: U6.4 16.359,9.533 v1(16.391,9.501) ; v1(22.901,13.386) 23.698,13.386 24.178,12.906 U5.1
  Bottom Layer w0.254: v1(16.391,9.501) 20.786,9.501 22.901,11.617 v1(22.901,13.386)
NetU5_3: U5.3 U6.5 | length 4.1
  Top Layer w0.254: U6.5 22.623,9.533 23.318,10.228 24.01,10.228 U5.3
NetU6_1: U6.1 U6.8 | length 5.8
  Top Layer w0.254: U6.1 U6.8
nRESET: JP4.3 U7.47 | length 55.4
  Top Layer w0.254: U7.47 v1@34.735,34.171
  Bottom Layer w0.254: JP4.3 5.614,12.184 9.199,8.598 20.984,8.598 23.638,11.252 23.638,25.603 32.216,34.181 v1(34.745,34.181)
PWM1: JP1.8 U7.39 | length 36.2
  Top Layer w0.254: U7.39 v1@34.735,26.171
  Bottom Layer w0.254: JP1.8 21.835,2.769 27.13,8.064 27.13,23.812 29.499,26.181 v1(34.745,26.181)
PWM2: JP1.7 U7.40 | length 37.6
  Top Layer w0.254: U7.40 v1@34.735,27.171
  Bottom Layer w0.254: JP1.7 20.565,2.616 26.548,8.6 26.548,24.017 29.712,27.181 v1(34.745,27.181)
PWM3: JP1.6 U7.41 | length 39.1
  Top Layer w0.254: U7.41 v1@34.735,28.171
  Bottom Layer w0.254: JP1.6 19.295,2.515 25.966,9.186 25.966,24.299 29.848,28.181 v1(34.745,28.181)
PWM4: JP1.5 U7.42 | length 40.5
  Top Layer w0.254: U7.42@32.22,29.176 v1(34.745,29.176)
  Bottom Layer w0.254: JP1.5 18.025,2.337 25.384,9.696 25.384,24.581 29.979,29.176 v1(34.745,29.176)
PWM5: JP1.4@16.755,0.889 U7.43 | length 42
  Top Layer w0.254: U7.43@32.22,30.176 v1(34.745,30.176)
  Bottom Layer w0.254: JP1.4@16.755,0.889 16.755,2.159 24.802,10.206 24.802,24.938 30.04,30.176 v1(34.745,30.176)
PWM6: JP1.3@15.485,0.889 U7.44 | length 43.5
  Top Layer w0.254: U7.44@32.22,31.176 v1(34.745,31.176)
  Bottom Layer w0.254: JP1.3@15.485,0.889 15.485,1.981 24.22,10.717 24.22,25.296 30.1,31.176 v1(34.745,31.176)
RXD: R23.2 U7.16 | length 15.6
  Top Layer w0.254: R23.2 -0.002,16.96 0.657,17.62 9.415,17.62 11.967,20.171 U7.16
SCL: JP1.2@16.213,13.911 R19.1 U7.15 U8.19 | length 22.8
  Top Layer w0.254: U8.19 7.453,26.447 8.071,25.829 8.071,21.647 8.644,21.074 9.609,21.074 R19.1 R19.1@9.731,21.145 ; v1(11.108,21.145) v1@11.121,21.158 ; U7.15@13.482,21.158 U7.15
  Top Layer w0.508: R19.1@9.731,21.145 v1(11.108,21.145) ; v1@11.121,21.158 U7.15@13.482,21.158
  Bottom Layer w0.254: v1(11.108,21.145) 12.932,21.145 17.161,16.916 17.161,14.859 JP1.2@16.213,13.911
SDA: JP1.1@18.753,13.911 R17.1 U7.14 U8.20 | length 23.9
  Top Layer w0.254: U8.20 7.316,27.422 8.525,26.213 8.525,22.581 8.82,22.285 R17.1 R17.1@9.779,22.141 ; v1(11.108,22.141) v1@11.123,22.156 ; U7.14@13.48,22.156 U7.14
  Top Layer w0.508: R17.1@9.779,22.141 v1(11.108,22.141) ; v1@11.123,22.156 U7.14@13.48,22.156
  Bottom Layer w0.254: v1(11.108,22.141) 11.138,22.171 12.77,22.171 17.821,17.12 17.821,14.843 JP1.1@18.753,13.911
SWCLK: J2.3 U7.2 | length 10.8
  Top Layer w0.254: J2.3 4.961,35.527 10.244,35.527 11.6,34.171 U7.2
SWDIO: J2.2 U7.3 | length 9.8
  Top Layer w0.254: v1(11.438,33.139) 11.454,33.155 13.479,33.155 U7.3
  Bottom Layer w0.254: J2.2@6.299,34.028 J2.2@6.405,34.134 ; J2.2 6.307,34.688 7.247,35.628 10.143,35.628 11.438,34.333 v1(11.438,33.139)
TP1: U7.5
TP2: U7.4
TP3: U7.22
TP4: U7.13
TP5: pad.2@24.36,15.842 U7.26 | length 2.4
  Top Layer w0.254: U7.26 24.358,18.209 24.358,15.844 pad.2@24.36,15.842
TP6: U7.7
TP7: pad.2@34.654,19.144 U7.32 | length 2.4
  Top Layer w0.254: U7.32 32.229,19.157 34.64,19.157 pad.2@34.654,19.144
TP8: U7.6
TP9: pad.2@34.654,21.155 U7.34 | length 2.4
  Top Layer w0.254: U7.34 32.223,21.163 34.646,21.163 pad.2@34.654,21.155
TP10: pad.2@34.654,33.164 U7.46 | length 2.4
  Top Layer w0.254: U7.46 32.219,33.168 34.65,33.168 pad.2@34.654,33.164
TP11: pad.2@34.654,24.173 U7.37 | length 2.4
  Top Layer w0.254: U7.37 32.216,24.172 34.653,24.172 pad.2@34.654,24.173
TP12: pad.2@34.654,20.149 U7.33 | length 2.4
  Top Layer w0.254: U7.33 32.226,20.16 34.643,20.16 pad.2@34.654,20.149
TP14: pad.2@26.364,15.842 U7.28 | length 2.4
  Top Layer w0.254: U7.28 26.36,18.207 26.36,15.846 pad.2@26.364,15.842
TP15: pad.2@23.358,15.842 U7.25 | length 2.4
  Top Layer w0.254: U7.25 23.357,18.21 23.357,15.843 pad.2@23.358,15.842
TP16: pad.2@27.366,15.842 U7.29 | length 2.4
  Top Layer w0.254: U7.29 27.361,18.205 27.361,15.847 pad.2@27.366,15.842
TP17: U7.23
TP18: pad.2@25.362,15.842 U7.27 | length 2.4
  Top Layer w0.254: U7.27 25.359,18.208 25.359,15.845 pad.2@25.362,15.842
TP19: pad.2@34.654,23.167 U7.36 | length 2.4
  Top Layer w0.254: U7.36 32.217,23.169 34.652,23.169 pad.2@34.654,23.167
TP20: pad.2@34.654,22.161 U7.35 | length 2.4
  Top Layer w0.254: U7.35 32.22,22.166 34.649,22.166 pad.2@34.654,22.161
TP21: pad.2@34.654,32.148 U7.45 | length 2.4
  Top Layer w0.254: U7.45 32.227,32.16 34.642,32.16 pad.2@34.654,32.148
TP23: pad.2@28.368,15.842 U7.30 | length 2.4
  Top Layer w0.254: U7.30 28.362,18.204 28.362,15.848 pad.2@28.368,15.842
TP24: pad.2@29.37,15.842 U7.31 | length 2.4
  Top Layer w0.254: U7.31 29.363,18.203 29.363,15.849 pad.2@29.37,15.842
TP25: U7.18
TXD: R22.1 U7.17 | length 12.7
  Top Layer w0.254: R22.1 2.442,16.921 2.684,17.162 10.096,17.162 12.038,19.104 13.428,19.104 U7.17
USB_DN: R21.2 U7.19 | length 18.9
  Top Layer w0.254: R21.2 1.244,16.181 1.244,16.931 v1(1.252,16.939) ; v1(6.739,16.4) 6.833,16.4 7.043,16.19 16.872,16.19 17.346,16.664 U7.19@17.346,18.202
  Bottom Layer w0.254: v1(1.252,16.939) 1.79,16.4 v1(6.739,16.4)
USB_DP: R20.1 U7.20 | length 16.9
  Top Layer w0.254: R20.1 5.348,16.174 5.816,15.706 17.573,15.706 18.355,16.488 U7.20
VCC_3V3: C4.1 C6.1 C7.1 C9.1 C10.1 J2.1 JP1.1@12.945,0.889 JP1.4@11.133,13.911 L1.2 L2.2 R4.1 R12.2 R13.2 R14.2 R16.1 R17.2 R18.2 R19.2 U7.12 U8.18 | length 129.8
  Top Layer w0.254: v1(3.156,25.629) 3.235,25.629 3.552,25.947 U8.18
  Top Layer w0.381: L2.2 3.774,19.389 5.466,19.389 R14.2@5.474,19.381 ; R18.2 5.261,20.494 5.474,20.282 R14.2@5.474,19.381 ; R14.2 R14.2@5.474,19.381
  Top Layer w0.5: v2(3.716,18.509) v2@3.74,18.509 ; v2@3.74,18.491 v2@3.74,18.509 ; L2.2 v2@3.74,18.509 ; R19.2 9.606,19.542 8.572,18.509 v2@3.74,18.509
  Top Layer w0.762: R16.1@0.397,31.184 0.426,31.184 0.448,31.206 0.448,31.753 1.175,32.479 8.839,32.479 ; C4.1@1.167,5.42 C4.1@1.167,5.651 ; C4.1@1.263,5.517 1.391,5.389 1.391,4.124 1.51,4.005 L1.2 ; C6.1@2.551,7.637 2.551,7.687 2.602,7.738 C7.1@2.602,9.009 ; R13.2 R12.2 9.431,9.555 11.133,11.257 JP1.4@11.133,13.911 ; J2.1@8.839,34.325 8.839,32.479 ; R17.2 R17.2@9.635,24.165 ; C9.1 R17.2@9.635,24.165 ; C10.1 9.654,28.04 10.526,28.04 10.972,27.594 ; U7.12 13.489,24.165 10.972,24.165 ; 8.839,32.479 10.015,32.479 10.972,31.522 10.972,27.594 ; R17.2@9.635,24.165 10.972,24.165 ; 10.972,24.165 10.972,27.594
  Bottom Layer w0.5: v2(0.981,4.47) 0.981,2.287 2.43,0.838 12.894,0.838 JP1.1@12.945,0.889 ; v1(3.156,25.629) 3.156,29.149 6.206,32.199 8.847,32.199 ; v2(3.716,18.509) 6.536,18.509 11.133,13.911 13.419,11.625 19.693,11.625 20.935,12.867 20.935,25.99 14.726,32.199 8.847,32.199 ; J2.1 8.847,32.199
VIN_OR: C2.1 C3.1 R2.1 U2.3 U3.3 U4.4
pads on no net: U5.4 U8.1 U8.7 U8.8 U8.12 U8.13 U8.15 U8.16 U8.21 U8.22 U8.23 U8.24

## Polygon pours and split planes (outlines as drawn)
GND_Pin on Top Layer "GND_PIN_L01_P026" (solid, remove dead copper, pour order 26): 31.047,0.805 32.444,0.805 32.469,0.83 32.469,2.303 31.047,2.303
GND on Top Layer "GND_L01_P027" (solid, remove dead copper, pour order 27): -1.008,35.552 35.492,35.552 35.492,-0.008 35.466,0.017 -1.008,0.017
VIN_OR on Top Layer "VIN_OR_L01_P025" (solid, remove dead copper, pour order 25): 7.907,1.516 8.72,2.329 8.72,3.396 9.965,4.64 9.965,7.917 10.646,8.598 18.067,8.598 18.067,7.587 11.692,7.587 11.362,7.256 11.362,4.132 10.295,3.065 10.295,0.017 6.282,0.017 6.282,1.516
NetL1_1 on Top Layer "NETL1_1_L01_P020" (solid, remove dead copper, pour order 20): 5.185,1.266 2.858,1.266 2.608,1.516 0.897,1.516 0.719,1.338 0.719,0.17 0.889,0 5.071,0 5.196,0.125 5.196,1.256
VCC_3V3 on Top Layer "VCC_3V3_L01_P023" (solid, remove dead copper, pour order 23): 5.977,8.806 6.255,9.084 6.899,9.084 8.084,9.084 8.243,9.243 8.243,9.817 8.088,9.971 2.129,9.971 2.129,7.366 0.491,6.324 0.491,3.421 2.497,3.421 2.497,4.573 1.786,4.573 1.786,5.752 1.906,6.139 5.977,7.24
5V_DEBUG on Top Layer "5V_DEBUG_L01_P019" (solid, remove dead copper, pour order 19): 23.173,4.183 22.893,3.904 22.497,3.507 21.391,3.507 21.287,3.403 21.287,1.736 21.609,1.414 24.671,1.414 24.798,1.541 24.798,3.243 25.002,3.446 25.129,3.573 25.129,4.089 25.034,4.183
BAT+ on Top Layer "BAT+_L01_P013" (solid, remove dead copper, pour order 13): 32.517,3.675 30.515,3.675 30.029,4.16 28.108,4.16 27.965,4.017 27.965,2.877 28.583,2.259 28.583,1.123 28.673,1.033 30.124,1.033 30.283,1.193 30.283,2.292 30.718,2.727 32.517,2.727
GND on Bottom Layer "GND_L02_P028" (solid, remove dead copper, pour order 28): -1.008,35.552 35.492,35.552 35.492,-0.008 35.466,0.017 -1.008,0.017

## Keep-outs
Keep-Out Layer:
  the board outline again, w0.254

## Other copper
Top Layer:
  pour cut-out: 1.972,27.422 6.087,27.422 6.087,24.46 1.972,24.46

## Silkscreen, mask and mechanical layers (free items; w line width, h text height)
Top Overlay:
  drawing of 15 lines, arcs and shapes, not listed
  text "GNG" at 0.166,35.861 h1.02
  text "CLK" at 2.802,35.861 h1.02
  text "DIO" at 5.469,35.861 h1.02
  text "3V3" at 8.009,35.861 h1.02
  text "Y" at -0.288,27.534 h1.02
  text "Z" at -0.289,23.238 h1.02
  text "X" at 7.28,23.238 h1.02
  text "DP" at 4.019,16.977 h1.02 r90
  text "DN" at 1.556,16.952 h1.02 r90
  text "TX" at 2.775,16.952 h1.02 r90
  text "RX" at 0.286,16.927 h1.02 r90
  text "3V3" at 10.339,15.566 h1.02
  text "GND" at 12.686,15.566 h1.02
  text "SCL" at 15.341,15.566 h1.02
  text "SDA" at 17.814,15.566 h1.02
  text "+" at 30.674,4.516 h1.52
  text "3V3" at 12.271,2.547 h1.02
  text "G" at 14.338,2.526 h1.02
  text "6" at 15.469,2.526 h1.02
  text "5" at 16.429,2.526 h1.02
  text "3" at 18.37,2.526 h1.02
  text "4" at 17.389,2.515 h1.02
  text "2" at 19.325,2.515 h1.02
  text "1" at 20.285,2.515 h1.02
  text "-" at 31.34,0.805 h1.52 r90
Bottom Overlay:
  drawing of 69 lines, arcs and shapes, not listed
  text "3itech@ueh.edu.vn" at 24.73,20.422 h1.02
  text "https://ai.ueh.edu.vn" at 25.045,18.748 h1.02
  text "designed by LMT" at 23.908,16.696 h1.02
  text "DN/RX" at 3.789,7.749 h1.27
  text "DP/TX" at 7.252,7.749 h1.27
  text "BOOT" at 3.628,6.123 h1.27
  text "RST" at 6.854,6.123 h1.27
  text "GND" at 3.324,4.624 h1.27
  text "5V" at 6.473,4.624 h1.27
  text "Cyborg GreenC / Ver_202605" at 27.18,3.023 h1.02